# Altium PCB PCB4210B_A00.PcbDoc (part 2 of 2)
Units mm, origin at the board's own origin, x right, y up, seen from the top; angles counter-clockwise.
Board outline 92 x 45 mm, 4 copper layers (Top Layer, Signal Layer 2, Signal Layer 3, Bottom Layer), stack 1.6 mm thick; 99 components, 93 nets, 352 pads, 891 vias.
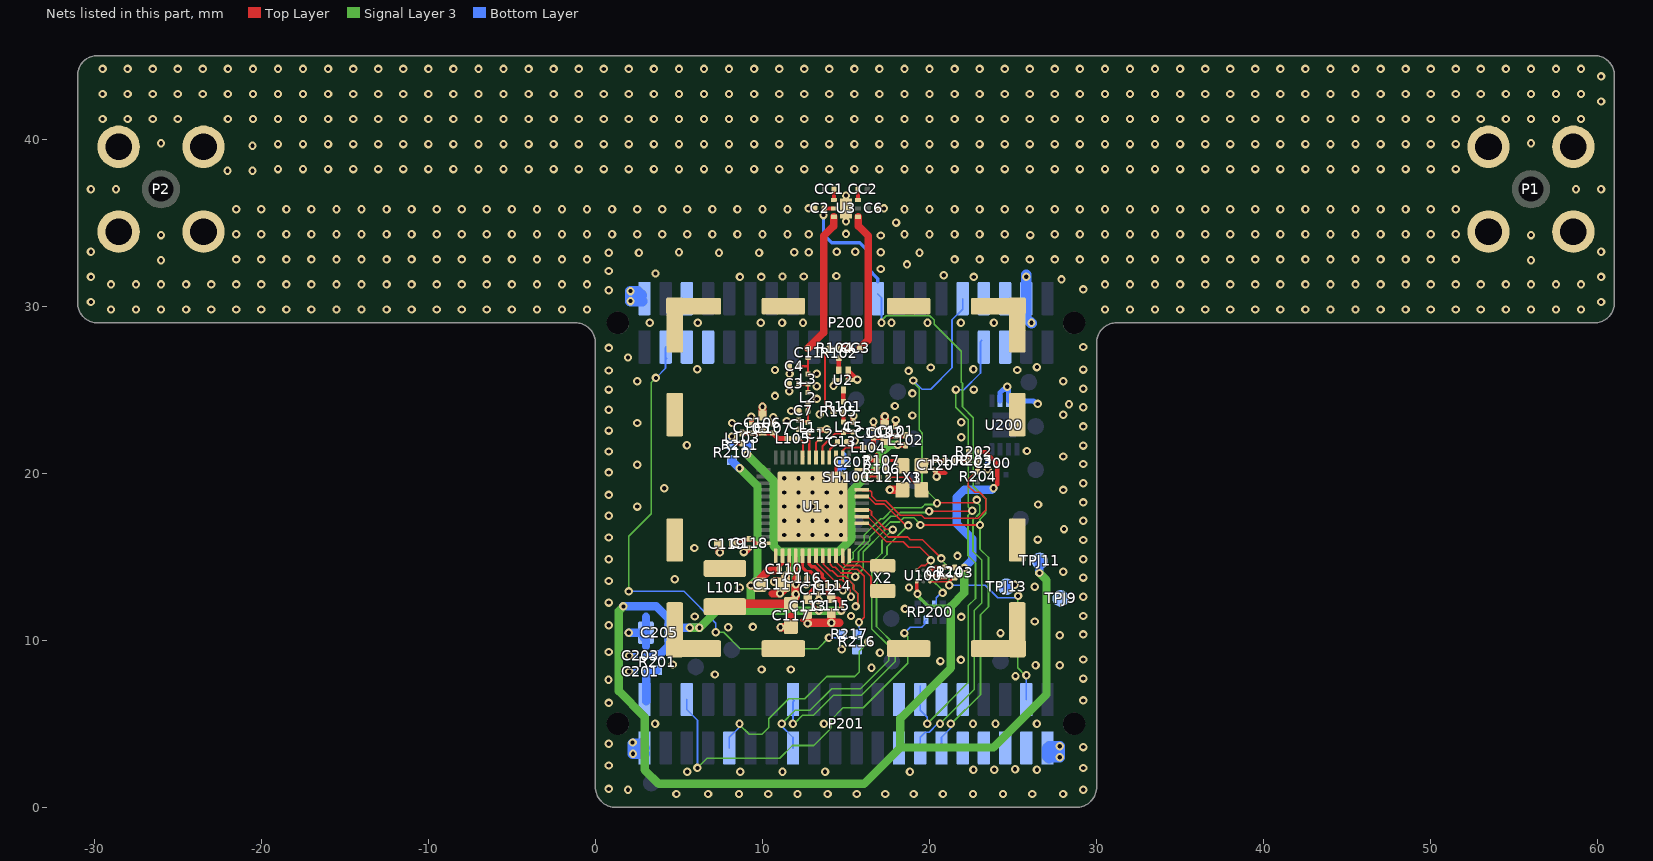
[diagram p4: the nets of this part, all layers, seen from the top]

## Via types
v1: diameter 0.5, hole 0.25, Top Layer to Bottom Layer, tented both sides, 814 vias
v2: diameter 0.508, hole 0.25, Top Layer to Bottom Layer, tented both sides, 77 vias

## Nets (pads, with @x,y where several pads share a name; then routed paths per layer and width w, separated by ;. In a path a pad name is that pad's centre, name@x,y a point inside that pad or via, vN(x,y) a via of type N, cw(c..) or ccw(c..) an arc to the next point about the centre after c; other vN are vias at no path point) (continued)
EFR32_PC3: RP200.3 U1.4 U100.E1 | length 9.4
  Top Layer w0.1: U1.4@15.935,17 16.25,17 16.3,16.95 16.375,16.95 17.425,15.9 18.425,15.9 18.75,15.575 19.425,15.575 20.076,14.924 v2(20.076,14.776) ; U100.E1@19.225,14.2 19.5,14.475 19.75,14.475 v2@20.037,14.762
  Signal Layer 3 w0.1: v2(20.076,14.776) 20.076,13.689 20.784,12.981 v2(20.784,12.828)
  Bottom Layer w0.1: RP200.3@20.3,12.125 20.4,12.225 20.4,12.55 20.731,12.881 v2(20.784,12.828)
EFR32_PC4: P201.38 R103.1 U1.5 U100.A3 | length 21
  Top Layer w0.1: U1.5@15.935,17.4 15.985,17.35 16.35,17.35 17.525,16.175 18.7,16.175 18.85,16.025 19.575,16.025 20.663,14.937 20.627,14.901 v2(20.701,14.901) ; U100.A3@20.025,13.5 20.025,13.495 21.16,13.495 21.415,13.75 R103.1@21.5,13.75 ; v2@21.195,13.47 R103.1@21.45,13.725
  Signal Layer 3 w0.1: v2(20.701,14.901) v2@20.596,14.901 ; v2(21.176,13.296) 21.176,14.32 v2@20.625,14.871 ; v2(25.3,12.65) 25.275,12.625 25.275,8.35 25.75,7.875 25.775,7.9 v2(25.8,7.9) ; v2@20.596,14.901 v2@20.625,14.871 ; v2@20.596,14.901 20.524,14.901 20.494,14.871 v2@20.625,14.871
  Bottom Layer w0.1: v2(21.176,13.296) 23.329,13.296 24.075,12.55 25.2,12.55 v2(25.3,12.65) ; P201.38@25.795,6.45 25.795,7.895 v2(25.8,7.9)
EFR32_PC5: P201.15 U1.6 | length 20.9
  Top Layer w0.1: U1.6@15.935,17.8 16.425,17.8 16.522,17.703 16.522,17.501 17.373,16.65 17.775,16.65 v2(17.8,16.625)
  Signal Layer 3 w0.1: v2(11.15,5) 11.95,5.8 12.85,5.8 14.15,7.1 15.866,7.1 17.55,8.784 17.55,9.675 16.55,10.675 16.55,14.622 17.15,15.222 17.15,15.975 v2(17.8,16.625)
  Bottom Layer w0.1: v2(11.15,5) 11.15,4.85 11.825,4.175 P201.15@11.825,3.55
EFR32_PC7: P201.16 U1.8 | length 22.2
  Top Layer w0.1: U1.8@15.935,18.6 16.3,18.6 16.745,18.155 17.293,18.155 18.573,16.875 v2(18.725,16.875)
  Signal Layer 3 w0.1: v2(11.825,5) 11.9,5 12.4,5.5 13.05,5.5 14.25,6.7 15.925,6.7 17.95,8.725 17.95,9.7 16.825,10.825 16.825,14.5 17.454,15.129 17.454,15.604 v2(18.725,16.875) ; v2@11.9,4.904 v2@11.948,4.952
  Bottom Layer w0.1: v2(11.825,5) 11.825,6.299 11.9,6.375 P201.16@11.825,6.45
EFR32_PC8: R203.2 R204.2 U1.9 | length 12.2
  Top Layer w0.1: U1.9@15.935,19 15.985,18.95 16.45,18.95 16.55,18.85 16.55,18.633 16.828,18.355 17.376,18.355 18.255,17.476 19.524,17.476 19.7,17.3 22.9,17.3 23.375,17.775 23.375,18.475 23,18.85 22.7,18.85 22.325,19.225 22.325,19.625 R204.2@22.75,20.05
  Top Layer w0.2: R204.2@22.9,20.115 R203.2@22.9,20.75
EFR32_PD0: U1.48 X2.1 | length 2
  Top Layer w0.1: U1.48@15.2,14.725 15.225,14.7 17.075,14.7 X2.1@17.15,14.775
EFR32_PD1: U1.47 X2.2 | length 3.7
  Top Layer w0.1: U1.47@14.8,15.065 14.85,15.015 14.85,14.575 14.95,14.475 15.825,14.475 16.5,13.8 16.5,13.275 X2.2@17.15,13.275
EFR32_PD2: R216.1 R217.1 U1.46 | length 6.1
  Top Layer w0.1: U1.46@14.4,15.065 14.4,14.708 14.858,14.25 15.675,14.25 16.1,13.825 16.1,11.375 v1@15.8,11.075
  Signal Layer 3 w0.1: v1@15.775,11.1 v1@15.8,11.075
  Bottom Layer w0.1: R216.1@15.7,10.325 15.775,10.4 v1(15.775,11.075)
EFR32_PD3: C2.2 P200.24 P201.29 U1.45 U3.2 | length 53.2
  Top Layer w0.1: U1.45@14,15.065 14.05,15.015 14.05,14.55 14.225,14.375 14.35,14.375 14.7,14.025 15.35,14.025 15.55,13.825 v1(15.55,13.8) ; v1(19.45,16.9) 19.45,17.002 19.501,16.951 19.526,16.926 19.576,16.976 19.627,16.925 19.652,16.9 v1(23.025,16.9)
  Top Layer w0.25: C2.2@13.7,35.85 U3.2@14.25,35.85
  Signal Layer 3 w0.1: v1(15.55,13.8) 16.025,14.275 16.025,15.292 17.3,16.567 17.3,16.725 17.65,17.075 18.2,17.075 18.45,17.325 19.075,17.325 19.45,16.95 v1(19.45,16.9) ; v1(17.125,29) 16.975,29 17.4,29.425 20.017,29.425 20.276,29.166 20.276,28.924 21.9,27.3 21.9,25.442 21.975,25.367 21.975,23.975 22.625,23.325 22.625,19.225 23.375,18.475 23.375,17.6 23.025,17.25 v1(23.025,16.9) 23.025,15.45 23.525,14.95 23.525,12 23.05,11.525 23.05,6.742 21.308,5 v1(21.275,5)
  Bottom Layer w0.1: P200.24@16.9,30.725 17.125,30.5 v1(17.125,29) ; P201.29@20.715,3.55 20.715,4.19 21.275,4.75 v1(21.275,5)
  Bottom Layer w0.2: v1(13.65,35.45) 13.65,34.296 14.146,33.8 15.825,33.8 16.325,33.3 16.325,32.225 16.9,31.65 P200.24@16.9,31.45
EFR32_PD4: P200.33 P201.28 U1.44 | length 44.3
  Top Layer w0.1: U1.44@13.6,15.065 13.65,15.015 13.65,14.55 14.05,14.15 14.175,14.15 14.5,13.825 14.953,13.825 15.45,13.328 15.45,13.05 15.701,12.799 15.701,12.151 v1(15.575,12.025) ; v1(19.977,17.725) 22.534,17.725 v1(22.555,17.746)
  Signal Layer 3 w0.1: v1(15.575,12.025) 15.7,12.15 15.7,12.8 15.45,13.05 15.45,13.328 15.1,13.678 15.1,14.05 15.75,14.7 15.75,15.3 16.425,15.975 16.425,16.175 17.675,17.425 18.025,17.425 18.25,17.65 19.902,17.65 v1(19.977,17.725) ; v1(19.859,5) 22.325,7.466 22.325,12.075 22.75,12.5 22.75,14.625 22.3,15.075 22.3,17.491 v1(22.555,17.746) 22.325,17.976 22.325,23.2 21.575,23.95 v1(21.575,25)
  Bottom Layer w0.1: P201.28@19.445,7.263 P201.28@19.445,6.45 19.445,5.805 19.859,5.391 v1(19.859,5) ; v1(21.575,25) 22.05,25 23.05,26 23.05,27.875 P200.33@23.125,27.95
EFR32_PD5: P200.32 P201.27 U1.43 | length 47.9
  Top Layer w0.1: U1.43@13.2,15.065 13.2,14.675 14.25,13.625 14.77,13.625 15.25,13.145 v1@15.25,12.601 ; v1@20.326,18.226 22.651,18.226 v1(22.825,18.4)
  Signal Layer 3 w0.1: v1(15.3,12.601) 15.25,12.651 15.25,13.145 14.825,13.57 14.825,14.3 15.425,14.9 15.425,15.25 ; 15.421,15.254 16.1,15.933 16.1,16.3 17.075,17.275 17.221,17.275 17.871,17.925 19.525,17.925 19.725,18.125 v1@20.375,18.125 ; v1@19.05,25.4 19.375,25.075 19.375,22.6 19.55,22.425 19.55,19.225 v1@20.475,18.3 ; v1(20.625,5) 22.675,7.05 22.675,11.775 23.125,12.225 23.125,14.8 22.6,15.325 22.6,17.2 23,17.6 23,18.075 22.825,18.25 v1(22.825,18.4)
  Bottom Layer w0.1: v1(19.024,25.55) 19.549,25.025 20.072,25.025 21.35,26.303 21.35,29.18 21.985,29.815 P200.32@21.985,30.45 ; P201.27@19.445,3.55 19.445,4.195 19.75,4.5 19.975,4.5 20.475,5 v1(20.625,5)
  other v1: 20.451,18.201
EXP_HEADER6: P201.6 RP200.7 | length 23.7
  Signal Layer 3 w0.1: v2@6.11,2.56 v2(6.11,2.358) 6.682,2.93 11.03,2.93 11.8,3.7 13.063,3.7 14.1,4.737 14.1,5.225 14.825,5.95 16.025,5.95 18.7,8.625 18.7,10.225 v2(18.5,10.425)
  Bottom Layer w0.1: P201.6@5.475,6.45 5.475,5.85 6.11,5.215 v2(6.11,2.358) ; v2(18.5,10.425) 18.85,10.775 19.534,10.775 19.7,10.941 19.7,11.125 RP200.7@19.8,11.225
EXP_HEADER9: P201.9 R216.2 | length 13.9
  Signal Layer 3 w0.1: v2@8.6,5.15 8.6,4.975 9.2,4.375 9.975,4.375 10.375,4.775 10.375,5.3 11.575,6.5 12.525,6.5 13.85,7.825 15.525,7.825 15.8,8.1 15.8,9.325 v1@16.4,9.925 ; v1@16.4,9.85 v1@16.475,9.85
  Bottom Layer w0.1: P201.9@8.015,3.55 8.015,4.19 8.625,4.8 v2(8.625,5) ; R216.2@15.9,9.7 16.2,9.7 16.326,9.826 v1(16.326,9.9)
GND: C2.1 C3.2 C4.2 C5.2 C6.1 C7.2 C12.2 C13.2 C101.2 C102.2 C103.2 C105.2 C106.2 C107.2 C110.2 C111.2 C112.2 C113.2 C114.2 C115.2 C116.2 C117.2 C118.2 C119.2 C120.2 C124.2 C200.2 C201.2 C203.2 C205.2 C207.2 P1.2 P1.3 P1.4 P1.5 P2.2 P2.3 P2.4 P2.5 P200.2 P200.38 P201.1 P201.39 R107.2 SH100.1 TPJ13.1 U1.0 U1.15 U1.39 U2.2 U2.3 U2.5 U3.7 U100.B2 U200.2 U200.3 U200.4 X1.2 X3.2 | length 44
  Top Layer w0.125: v1@12.425,28.989 v1(12.425,29)
  Top Layer w0.2: v1@2.2,3.8 v1@2.225,3.825 ; U1.0@11.35,16.4 U1.0@11.5,16.25 ; C110.2@11.6,14.3 U1.39@11.6,15.065 ; 12.35,11.199 12.501,11.199 v1(12.7,11) ; U1.15@14.4,20.935 14.4,19.825 U1.0@14.5,19.725 ; U100.B2@19.825,13.85 20.425,13.85 v1@20.45,13.825
  Top Layer w0.25: U2.3@15.112,26.163 v1(15.675,25.6) ; U2.2@15.138,25.675 U2.3@15.138,26.163 ; v1@16.51,20.75 R107.2@16.835,20.75 ; R107.2@16.825,20.75 16.825,21.075 ; v2@20.35,19.945 20.35,20.175 20.758,20.175 ; v2@20.538,20.013 20.945,20.013
  Top Layer w0.3: v1@8.975,15.225 C118.2@9.2,15.45 ; C105.2@9.35,22.95 9.35,23.3 v1@9.375,23.325 ; C107.2@10.6,22.95 10.625,22.975 v1@10.625,23.375 ; v1(11.401,13.851) 11.416,13.851 11.4,13.867 11.55,14.017 C110.2@11.55,14.275 ; v1@11.575,24.925 11.6,24.95 C3.2@11.6,25.35 ; v1@11.625,25.925 C4.2@11.625,26.4 ; v1@11.775,23.725 C7.2@12.175,23.725 ; v1@12.625,13.4 12.675,13.45 C116.2@12.675,13.725 ; v1@12.725,35.85 C2.1@13.125,35.85 ; C112.2@13.35,12.75 13.35,12.425 v1(13.375,12.4) ; C12.2@13.4,22.6 v1@13.85,22.6 ; C114.2@14.475,13.275 14.495,13.295 14.505,13.295 v1(14.824,12.976) ; C13.2@15.05,21.875 15.45,21.875 v1@15.5,21.925 ; C5.2@15.425,23.025 v1@15.425,23.375 ; v1(15.526,21.94) v1@15.571,21.94 ; C103.2@16.65,22.675 v1(16.65,23.075) v1@16.65,23.125 ; C6.1@16.925,35.85 v1@17.325,35.85 ; C101.2@17.975,22.775 v1@17.975,23.125 ; v1@20.525,13.825 20.55,13.8 C124.2@20.975,13.8
  Top Layer w0.5: C119.2@7.4,15.75 7.45,15.7 v1(7.45,15.25) ; C106.2@10,23.5 10,23.85 v1(10,23.975) ; 10.6,12.8 v1(11.05,12.8) 11.35,13.1 C111.2@11.35,13.2 ; v1(10.7,13.5) 10.95,13.5 11.075,13.375 C111.2@11.05,13.35 ; v1(11.075,10.775) C117.2@11.525,10.775 ; C111.2@11.401,13.176 v1(11.401,13.851) ; C117.2@11.7,10.9 11.7,11.4 ; v1(12.7,11) 12.75,11.05 14.6,11.05 ; v1@12.7,11.05 C113.2@12.7,11.575 ; v1(14.125,11.05) C115.2@14.125,11.6 ; C102.2@17.325,22.85 v1(17.325,23.4) ; v1(17.625,19) X1.2@18.075,19
  Bottom Layer w0.254: v1(0.8,9.3) v1@0.875,9.3 ; v1@1.95,8.125 v1(2.025,8.125) ; v1@1.975,9.075 v1(2.025,9.075) C203.2@2.4,9.075 ; v1@2,8.125 C201.2@2.4,8.125
  Bottom Layer w0.3: v1(2.025,8.125) 2,8.125 C201.2@2.4,8.125 ; v1(2.025,9.075) C203.2@2.4,9.075 ; v1@14.6,19.6 14.6,20.625 14.625,20.65 14.875,20.65 ; 14.875,20.3 14.875,20.65 ; 14.875,21.125 14.875,20.65 ; C207.2@15.1,20.65 14.875,20.65 ; v1@23.4,20.15 v1(23.475,20.225) v1@23.475,20.35 ; v1@23.475,20.4 C200.2@23.475,20.6 ; U200.2@24.225,24.325 24.225,24.825 24.413,25.013 24.688,25.013 24.725,24.975 U200.3@24.725,24.325 ; U200.4@25.225,24.325 26.225,24.325 v1@26.425,24.125
  Bottom Layer w0.5: v1(2,10.45) 2.9,10.45 3,10.35 2.85,10.2 C205.2@2.975,10.075 ; 3.025,9.65 C205.2@3.025,10.45 3.025,11.4 ; P200.38@25.795,30.45 P200.38@25.8,30.455
  Bottom Layer w0.508: TPJ13.1@24.6,13.2 24.725,13.325 v1(25.1,13.325)
  Bottom Layer w0.635: P200.2@2.785,30.65 2.535,30.9 v1(2.1,30.9) v1(2.1,30.3) P200.2@2.8,30.3 ; P201.1@2.9,3.25 2.95,3.2 v1(2.25,3.2) 2.25,3.8 2.685,3.8 P201.1@2.935,3.55 ; v1@25.795,31.868 v1(25.795,31.755) P200.38@25.795,30.45 25.795,29.274 v1@26.101,28.968 ; P201.39@27.065,3.55 27.7,3.55 v1(27.8,3.65) ; P201.39@27.065,3.55 27.065,3.035 27.15,2.95 27.2,3 v1(27.8,3) v1(27.8,3.65) ; P201.39@27.065,3.55 27.165,3.65 v1(27.8,3.65)
  other v1: 4.848,0.8 6.748,0.8 8.598,0.8 10.348,0.8 12.098,0.8 13.898,0.8 15.648,0.8 17.348,0.8 19.048,0.8 20.798,0.8 22.598,0.8 24.398,0.8 26.148,0.8 27.998,0.8 1.948,1.05 29.2,1.05 0.8,1.1 5.5,2.125 8.675,2.125 11.2,2.125 13.75,2.125 18.825,2.125 22.625,2.25 23.875,2.25 26.425,2.25 25.125,2.275 29.2,2.35 0.8,2.5 29.2,3.6 0.8,3.8 2.225,3.875 3.575,5 13.675,5 22.6,5 23.95,5 26.425,5 0.8,6.25 29.2,6.4 0.786,7.638 29.2,7.7 25.15,7.85 7.15,7.95 9.95,8.25 11.7,8.25 16.525,8.35 26.35,8.5 27.8,8.5 4.625,8.55 20.65,8.75 21.875,8.825 29.2,8.85 17.026,9.25 14.75,9.45 27.8,10.3 29.2,10.35 24.25,10.425 7.95,10.775 9.425,10.8 0.8,10.9 26.3,11.125 21.9,11.4 5.95,11.425 15.3,11.45 29.2,11.45 18.525,11.875 0.8,12.25 29.2,12.6 8.65,13.15 18.775,13.159 26.3,13.2 12.625,13.35 0.8,13.55 4.75,13.65 29.2,13.75 20.6,13.9 28,14.1 0.8,14.85 29.2,14.85 21.675,15.05 8.875,15.276 5.925,15.525 29.2,16 26.475,16.025 0.8,16.15 11.3,16.3 12.15,16.3 13,16.3 13.85,16.298 14.7,16.3 28.05,16.65 11.3,17.15 12.15,17.15 13,17.15 13.85,17.148 14.7,17.15 29.2,17.15 0.8,17.45 2.5,18 11.3,18 12.15,18 13,18 13.85,17.998 14.7,18 26.5,18.125 29.2,18.25 0.8,18.7 11.3,18.85 12.15,18.85 13,18.85 13.85,18.848 14.7,18.85 28,19 4.125,19.1 29.2,19.4 11.3,19.7 12.15,19.7 13,19.7 13.85,19.698 14.7,19.7 0.8,20.05 2.5,20.5 29.2,20.55 16.35,20.9 28,21 0.8,21.3 25.825,21.325 29.2,21.65 5.475,21.675 21.9,22.15 0.8,22.55 13.85,22.625 29.2,22.8 2.5,23 8.175,23 21.9,23.05 11.45,23.125 17.975,23.175 10.65,23.35 9.325,23.375 15.45,23.425 18.975,23.45 28,23.5 13.425,23.525 11.725,23.725 0.8,23.8 29.2,23.95 17.925,24.025 28.35,24.125 26.475,24.15 13.25,24.45 10.75,24.625 18.975,24.775 11.6,24.9 0.8,25 22.65,25 29.2,25.05 24.65,25.175 13.25,25.2 14.25,25.225 2.5,25.5 28,25.5 11.625,25.95 13.25,25.95 18.75,26.125 0.8,26.15 10.75,26.175 25.25,26.175 29.2,26.2 6.1,26.225 22.625,26.225 20.075,26.325 26.425,26.35 1.95,26.925 0.8,27.5 29.2,27.55 3.25,29 6.125,29 9.9,29 11.175,29 17.725,29 19.876,29 21.876,29 23.85,29 26.101,29 -29,29.8 -27.5,29.8 -26,29.8 -24.5,29.8 -23,29.8 -21.5,29.8 -20,29.8 -18.5,29.8 -17,29.8 -15.5,29.8 -14,29.8 -12.5,29.8 -11,29.8 -9.5,29.8 -8,29.8 -6.5,29.8 -5,29.8 -3.5,29.8 -2,29.8 -0.5,29.8 30.5,29.8 32,29.8 33.5,29.8 35,29.8 36.5,29.8 38,29.8 39.5,29.8 41,29.8 42.5,29.8 44,29.8 45.5,29.8 47,29.8 48.5,29.8 50,29.8 51.5,29.8 53,29.8 54.5,29.8 56,29.8 57.5,29.8 59,29.8 -30.2,30.25 60.2,30.25 0.8,30.95 29.2,31 -29,31.3 -27.5,31.3 -26,31.3 -24.5,31.3 -23,31.3 -21.5,31.3 -20,31.3 -18.5,31.3 -17,31.3 -15.5,31.3 -14,31.3 -12.5,31.3 -11,31.3 -9.5,31.3 -8,31.3 -6.5,31.3 -5,31.3 -3.5,31.3 -2,31.3 -0.5,31.3 30.5,31.3 32,31.3 33.5,31.3 35,31.3 36.5,31.3 38,31.3 39.5,31.3 41,31.3 42.5,31.3 44,31.3 45.5,31.3 47,31.3 48.5,31.3 50,31.3 51.5,31.3 53,31.3 54.5,31.3 56,31.3 57.5,31.3 59,31.3 27.9,31.6 -30.2,31.75 8.65,31.75 9.925,31.75 22.65,31.75 60.2,31.75 11.2,31.775 12.475,31.775 14.425,31.8 20.85,31.85 3.6,31.95 0.8,32.1 17.075,32.225 18.65,32.5 -26,32.75 56,32.75 -21.5,32.8 -20,32.8 -18.5,32.8 -17,32.8 -15.5,32.8 -14,32.8 -12.5,32.8 -11,32.8 -9.5,32.8 -8,32.8 -6.5,32.8 -5,32.8 -3.5,32.8 -2,32.8 -0.5,32.8 21.5,32.8 23,32.8 24.5,32.8 26,32.8 27.5,32.8 29,32.8 30.5,32.8 32,32.8 33.5,32.8 35,32.8 36.5,32.8 38,32.8 39.5,32.8 41,32.8 42.5,32.8 44,32.8 45.5,32.8 47,32.8 48.5,32.8 50,32.8 51.5,32.8 0.8,33.2 2.6,33.2 7.4,33.2 9.8,33.2 19.4,33.2 5,33.227 11.9,33.225 12.775,33.225 17.075,33.225 -30.2,33.25 14.45,33.25 15.55,33.25 60.2,33.25 17.075,34.225 -26,34.25 26.025,34.25 56,34.25 -21.5,34.3 -20,34.3 -18.5,34.3 -17,34.3 -15.5,34.3 -14,34.3 -12.5,34.3 -11,34.3 -9.5,34.3 -8,34.3 -6.5,34.3 -5,34.3 -3.5,34.3 -2,34.3 -0.5,34.3 1,34.3 2.5,34.3 4,34.3 5.5,34.3 7,34.3 8.5,34.3 10,34.3 11.5,34.3 12.775,34.3 18.5,34.3 20,34.3 21.5,34.3 23,34.3 24.5,34.3 27.5,34.3 29,34.3 30.5,34.3 32,34.3 33.5,34.3 35,34.3 36.5,34.3 38,34.3 39.5,34.3 41,34.3 42.5,34.3 44,34.3 45.5,34.3 47,34.3 48.5,34.3 50,34.3 51.5,34.3 15,34.325 18,35 15,35.075 -21.5,35.8 -20,35.8 -18.5,35.8 -17,35.8 -15.5,35.8 -14,35.8 -12.5,35.8 -11,35.8 -9.5,35.8 -8,35.8 -6.5,35.8 -5,35.8 -3.5,35.8 -2,35.8 -0.5,35.8 1,35.8 2.5,35.8 4,35.8 5.5,35.8 7,35.8 8.5,35.8 10,35.8 11.5,35.8 18.5,35.8 20,35.8 21.5,35.8 23,35.8 24.5,35.8 26,35.8 27.5,35.8 29,35.8 30.5,35.8 32,35.8 33.5,35.8 35,35.8 36.5,35.8 38,35.8 39.5,35.8 41,35.8 42.5,35.8 44,35.8 45.5,35.8 47,35.8 48.5,35.8 50,35.8 51.5,35.8 12.775,35.85 17.275,35.85 15,36.625 -30.2,37 -28.7,37 58.7,37 60.2,37 -22.025,38.1 -20.525,38.1 -19,38.2 -17.5,38.2 -16,38.2 -14.5,38.2 -13,38.2 -11.5,38.2 -10,38.2 -8.5,38.2 -7,38.2 -5.5,38.2 -4,38.2 -2.5,38.2 -1,38.2 0.5,38.2 2,38.2 3.5,38.2 5,38.2 6.5,38.2 8,38.2 9.5,38.2 11,38.2 12.5,38.2 14,38.2 15.5,38.2 17,38.2 18.5,38.2 20,38.2 21.5,38.2 23,38.2 24.5,38.2 26,38.2 27.5,38.2 29,38.2 30.5,38.2 32,38.2 33.5,38.2 35,38.2 36.5,38.2 38,38.2 39.5,38.2 41,38.2 42.5,38.2 44,38.2 45.5,38.2 47,38.2 48.5,38.2 50,38.2 51.5,38.2 -20.525,39.6 -19,39.7 -17.5,39.7 -16,39.7 -14.5,39.7 -13,39.7 -11.5,39.7 -10,39.7 -8.5,39.7 -7,39.7 -5.5,39.7 -4,39.7 -2.5,39.7 -1,39.7 0.5,39.7 2,39.7 3.5,39.7 5,39.7 6.5,39.7 8,39.7 9.5,39.7 11,39.7 12.5,39.7 14,39.7 15.5,39.7 17,39.7 18.5,39.7 20,39.7 21.5,39.7 23,39.7 24.5,39.7 26,39.7 27.5,39.7 29,39.7 30.5,39.7 32,39.7 33.5,39.7 35,39.7 36.5,39.7 38,39.7 39.5,39.7 41,39.7 42.5,39.7 44,39.7 45.5,39.7 47,39.7 48.5,39.7 50,39.7 51.5,39.7 -26,39.75 56,39.75 -29.5,41.2 -28,41.2 -26.5,41.2 -25,41.2 -22,41.2 -20.5,41.2 -19,41.2 -17.5,41.2 -16,41.2 -14.5,41.2 -13,41.2 -11.5,41.2 -10,41.2 -8.5,41.2 -7,41.2 -5.5,41.2 -4,41.2 -2.5,41.2 -1,41.2 0.5,41.2 2,41.2 3.5,41.2 5,41.2 6.5,41.2 8,41.2 9.5,41.2 11,41.2 12.5,41.2 14,41.2 15.5,41.2 17,41.2 18.5,41.2 20,41.2 21.5,41.2 23,41.2 24.5,41.2 26,41.2 27.5,41.2 29,41.2 30.5,41.2 32,41.2 33.5,41.2 35,41.2 36.5,41.2 38,41.2 39.5,41.2 41,41.2 42.5,41.2 44,41.2 45.5,41.2 47,41.2 48.5,41.2 50,41.2 51.5,41.2 53,41.2 54.5,41.2 56,41.2 57.5,41.2 59,41.2 60.2,42.25 -29.5,42.7 -28,42.7 -26.5,42.7 -25,42.7 -23.5,42.7 -22,42.7 -20.5,42.7 -19,42.7 -17.5,42.7 -16,42.7 -14.5,42.7 -13,42.7 -11.5,42.7 -10,42.7 -8.5,42.7 -7,42.7 -5.5,42.7 -4,42.7 -2.5,42.7 -1,42.7 0.5,42.7 2,42.7 3.5,42.7 5,42.7 6.5,42.7 8,42.7 9.5,42.7 11,42.7 12.5,42.7 14,42.7 15.5,42.7 17,42.7 18.5,42.7 20,42.7 21.5,42.7 23,42.7 24.5,42.7 26,42.7 27.5,42.7 29,42.7 30.5,42.7 32,42.7 33.5,42.7 35,42.7 36.5,42.7 38,42.7 39.5,42.7 41,42.7 42.5,42.7 44,42.7 45.5,42.7 47,42.7 48.5,42.7 50,42.7 51.5,42.7 53,42.7 54.5,42.7 56,42.7 57.5,42.7 59,42.7 60.2,43.75 -29.5,44.2 -28,44.2 -26.5,44.2 -25,44.2 -23.5,44.2 -22,44.2 -20.5,44.2 -19,44.2 -17.5,44.2 -16,44.2 -14.5,44.2 -13,44.2 -11.5,44.2 -10,44.2 -8.5,44.2 -7,44.2 -5.5,44.2 -4,44.2 -2.5,44.2 -1,44.2 0.5,44.2 2,44.2 3.5,44.2 5,44.2 6.5,44.2 8,44.2 9.5,44.2 11,44.2 12.5,44.2 14,44.2 15.5,44.2 17,44.2 18.5,44.2 20,44.2 21.5,44.2 23,44.2 24.5,44.2 26,44.2 27.5,44.2 29,44.2 30.5,44.2 32,44.2 33.5,44.2 35,44.2 36.5,44.2 38,44.2 39.5,44.2 41,44.2 42.5,44.2 44,44.2 45.5,44.2 47,44.2 48.5,44.2 50,44.2 51.5,44.2 53,44.2 54.5,44.2 56,44.2 57.5,44.2 59,44.2
  other v2: 20.425,19.8
JOYSTICK: P200.3 R217.2 | length 31.3
  Signal Layer 3 w0.1: v1(2,12.925) 2,16.225 3.35,17.575 3.35,25.425 v2(3.625,25.7) v2@3.75,25.575 ; v1(7.2,10.475) 7.675,10.475 8.65,9.5 13.325,9.5 v1(13.975,10.15) v1@14.05,10.225
  Bottom Layer w0.1: v1(2,12.925) 5.3,12.925 7.2,11.025 v1@7.2,10.5 ; v2(3.625,25.7) 4.2,26.275 P200.3@4.2,27.5 ; P200.3@4.205,27.55 4.205,26.92 P200.3@4.263,26.862 ; v1@14,10.125 14.025,10.15 14.55,10.15 R217.2@14.75,10.35
NetC1_1: C1.1 L1.1 U1.19 | length 2.1
  Top Layer w0.1: C1.1@12.25,22.625 12.25,22.55 12.225,22.525 12.6,22.525 L1.1@12.675,22.45
  Top Layer w0.125: U1.19@12.8,20.95 L1.1@12.8,22.425
NetC1_2: C1.2 C7.1 L1.2 L2.1 | length 1.8
  Top Layer w0.125: C1.2@12.225,23.1 12.65,23.1 L1.2@12.725,23.025 ; L1.2@12.73,22.987 12.73,23.725 L2.1@12.73,24.225
NetC3_1: C3.1 L2.2 L3.1 | length 1.2
  Top Layer w0.125: C3.1@12.125,25.325 L3.1@12.725,25.325 ; L2.2@12.725,24.75 L3.1@12.725,25.325 ; L3.1@12.725,25.275 L3.1@12.725,25.325
NetC4_1: C4.1 C11.1 L3.2 | length 2.2
  Top Layer w0.125: C4.1@12.179,26.354 12.225,26.4 12.725,26.4 12.725,26.933 C11.1@12.73,26.938 ; L3.2@12.73,25.845 C11.1@12.73,26.925
NetC5_1: C5.1 L4.1 U1.17 | length 2.8
  Top Layer w0.125: U1.17@13.6,20.95 13.6,21.625 14.35,22.375 14.875,22.375 14.875,22.425 15.3,22.425 C5.1@15.35,22.475 ; L4.1@14.847,22.445 L4.1@14.85,22.45 L4.1@14.86,22.463
NetC11_2: C11.2 U3.3 | length 8.5
  Top Layer w0.442: 14.275,34.8 U3.3@14.275,35.35
  Top Layer w0.457: C11.2@12.725,27.475 13.675,28.425 13.675,34.2 14.275,34.8
NetC12_1: C12.1 U1.18 | length 1.1
  Top Layer w0.125: U1.18@13.2,20.95 13.2,21.825 C12.1@13.35,21.975
NetC13_1: C13.1 U1.16 | length 1.1
  Top Layer w0.125: U1.16@14,20.95 14.05,21 14.05,21.45 14.4,21.8 C13.1@14.5,21.8
NetC101_1: C101.1 C102.1 C103.1 L102.2 L104.1 | length 2.5
  Top Layer w0.3: L104.1@16.65,21.6 C103.1@16.65,22.125 17.55,22.125 17.65,22.225 C101.1@17.975,22.225 L102.2@18.55,22.225
NetC105_1: C105.1 C106.1 C107.1 L103.2 L105.1 | length 3
  Top Layer w0.3: L103.2@8.775,22.4 C105.1@9.35,22.4 9.85,22.4 C106.1@10,22.55 10.15,22.4 C107.1@10.625,22.4 10.95,22.075 L105.1@11.5,22.075
NetC118_1: C118.1 C119.1 U1.36 | length 1.7
  Top Layer w0.2: C119.1@8.475,15.9 8.775,15.9 8.9,16.025 9.375,16.025 9.6,15.8 U1.36@10.065,15.8 U1.36@10.075,15.8
NetC120_1: C120.1 R108.2 X1.4 X3.4 | length 1.1
  Top Layer w0.2: X1.4@19.7,20.75 C120.1@20.25,20.75 ; C120.1@20.325,20.75 R108.2@20.875,20.75
NetC121_1: C121.1 X1.3 X3.3 | length 1.8
  Top Layer w0.1: C121.1@17.525,19.75 18.75,19.75 X1.3@19.125,19.375
NetC121_2: C121.2 U1.11 | length 1
  Top Layer w0.1: U1.11@15.935,19.8 16.875,19.8 C121.2@16.95,19.875
NetCC1_1: CC1.1 U3.1 | length 0.5
  Top Layer w0.25: U3.1@14.275,36.35 CC1.1@14.275,36.85
NetCC2_1: CC2.1 U3.6 | length 0.5
  Top Layer w0.25: U3.6@15.725,36.35 CC2.1@15.725,36.85
NetCC3_1: CC3.1 R102.2 R104.1 | length 0.6
  Top Layer w0.457: R104.1@14.66,27.485 CC3.1@15.24,27.485
NetCC3_2: CC3.2 U3.4 | length 8.2
  Top Layer w0.442: 15.725,34.8 U3.4@15.725,35.35
  Top Layer w0.457: 15.725,34.8 16.325,34.2 16.325,27.975 ; CC3.2@15.85,27.5 16.275,27.925
NetL4_2: L4.2 R101.1 R105.1 | length 0.6
  Top Layer w0.25: L4.2@14.85,23.05 R105.1@14.85,23.63
NetL101_1: L101.1 U1.37
NetL104_2: L104.2 U1.14 | length 1.7
  Top Layer w0.125: U1.14@14.8,20.935 14.8,21.35 14.977,21.527 15.973,21.527 15.975,21.525 L104.2@16.025,21.525 L104.2@16.05,21.525
NetL105_2: L105.2 U1.20 | length 1.2
  Top Layer w0.125: L105.2@12.261,22.014 12.438,21.837 U1.20@12.438,20.988 ; U1.20@12.4,20.95 U1.20@12.45,21
NetR101_2: R101.2 U2.1 | length 0.6
  Top Layer w0.25: R101.2@14.84,24.265 U2.1@14.84,24.845
NetR102_1: R102.1 U2.4 | length 0.6
  Top Layer w0.25: U2.4@14.565,26.23 R102.1@14.565,26.81
NetR104_2: R104.2 R105.2 | length 4.1
  Top Layer w0.125: R104.2@14.025,27.41 13.75,27.135 13.75,24.175 R105.2@14.25,23.675
NetR106_1: R106.1 R107.1 X1.1 X3.1 | length 1
  Top Layer w0.2: R106.1@17.425,20.25 R107.1@17.425,20.75 ; R107.1@17.425,20.76 17.925,20.76
NetR106_2: R106.2 U1.12 | length 0.8
  Top Layer w0.1: U1.12@15.935,20.2 R106.2@16.75,20.2
PAVDD: L103.1 R210.1 R211.2 | length 1.1
  Top Layer w0.3: v1(8.175,22.2) 8.15,22.2 8.125,22.175 8.5,21.8 L103.1@8.775,21.8
  Bottom Layer w0.5: R211.2@8.175,21.925 v1(8.175,22.2)
TCXO_supply: R108.1 R202.1 R203.1 | length 1.3
  Top Layer w0.25: R108.1@21.55,20.75 R203.1@22.325,20.75 ; R203.1@22.35,20.75 R202.1@22.35,21.275
USB_VBUS: P200.35
USB_VREG: P200.36
VDCDC: C116.1 C117.1 L101.2 L102.1 R211.1 U1.40 | length 29.9
  Top Layer w0.2: C116.1@12,13.85 12,14.55 U1.40@12,14.955
  Top Layer w0.3: v1(18.1,21.7) 18.5,21.7 L102.1@18.575,21.625
  Top Layer w0.5: L101.2@8.625,12.175 C117.1@11.55,12.175 ; C117.1@11.575,12.175 12,12.6 v1(12,12.75) ; v1@12.001,12.849 v1(12.001,13.351) 12.025,13.375 C116.1@12.025,13.685
  Signal Layer 3 w0.5: v2(9.075,21.125) 10.675,19.525 10.675,15.65 11.025,15.3 12.001,15.3 ; v1(12,12.75) v1@12,13.301 ; v1(12.001,13.351) 12.001,15.3 ; v1(18.1,21.7) 17.6,21.7 16.975,21.075 16.975,20.575 ; 12.001,15.3 14.549,15.3 15.325,16.076 15.325,18.925 ; 15.325,18.925 16.975,20.575 ; 15.325,18.925 16.975,20.575
  Bottom Layer w0.5: v2(9.075,21.125) 9.075,21.699 R211.1@9.1,21.725
VMCU: C110.1 C111.1 C112.1 C113.1 C114.1 C115.1 C124.1 C203.1 C205.1 R103.2 R201.2 R202.2 R210.2 TPJ11.1 U1.38 U1.41 U1.42 U100.A1 U100.E3 | length 114.1
  Top Layer w0.2: 10.625,14.025 10.775,14.025 C110.1@11,14.25 ; C110.1@10.9,14.25 10.9,14.275 10.9,14.3 11.2,14.6 U1.38@11.2,15.065 ; U1.41@12.4,15.08 U1.41@12.4,15.065 ; C113.1@12.65,12.575 12.85,12.575 12.85,12.9 13.2,13.25 13.2,13.8 12.9,14.1 12.65,14.1 12.4,14.35 12.4,14.575 ; C113.1@12.7,12.475 12.7,12.439 13.289,11.85 v1@13.375,11.85 ; U1.42@12.8,15 12.8,14.55 12.95,14.4 13.121,14.4 13.579,13.942 13.579,13.761 13.939,13.401 C114.1@13.95,13.39 ; v1@19.225,12.924 U100.E3@19.225,13.5 ; U100.A1@20.025,14.225 U100.A1@20.025,14.2 20.167,14.2 20.342,14.375 20.64,14.375 20.761,14.375 20.79,14.346 20.896,14.346 C124.1@20.925,14.375 C124.1@20.95,14.35 ; C124.1@21,14.35 R103.2@21.475,14.35 ; R103.2@21.5,14.35 21.55,14.4 21.625,14.325 v2(22.075,14.325) ; 12.4,14.575 U1.41@12.4,15.065 ; 12.4,14.575 U1.41@12.4,15.065
  Top Layer w0.25: R202.2@22.95,21.275 23.35,21.275 24.05,20.575 24.05,19.325 v1(23.825,19.1) v1@23.775,19.05
  Top Layer w0.3: 10.525,14.175 10.625,14.275 10.9,14.275 C110.1@11,14.275 ; C114.1@13.925,13.225 13.925,12.775 C115.1@14.125,12.575 ; C115.1@14.025,12.65 C115.1@14.05,12.625 ; C115.1@14.25,12.475 14.525,12.475 14.725,12.275 v1(14.725,11.775)
  Top Layer w0.5: v1(9.3,13.275) C111.1@9.825,13.275 ; C111.1@9.85,13.175 C111.1@9.825,13.175 ; 10.65,14.175 10.525,14.175 10.375,14.175 9.825,13.625 C111.1@9.825,13.275 ; C111.1@9.825,13.175 9.925,13.275 C111.1@9.825,13.275 ; C111.1@9.825,13.175 C111.1@9.825,13.275
  Signal Layer 3 w0.2: v1(19.276,12.776) 19.276,12.719 19.25,12.693 19.918,12.025 21.275,12.025
  Signal Layer 3 w0.5: v2(1.675,12.025) 1.4,11.75 1.4,6.95 2.95,5.4 2.95,2.24 3.79,1.4 16.075,1.4 18.25,3.575 ; v1(5.65,10.75) v1(6.225,10.75) 6.25,10.75 7.275,11.775 9.3,11.775 ; v2(8.628,20.297) 9.7,19.225 9.7,13.675 v1(9.3,13.275) 9.3,11.775 ; v1(14.725,11.775) v1(13.375,11.775) 9.3,11.775 ; v2(22.075,14.325) 22.075,12.825 21.275,12.025 21.275,8.35 18.25,5.325 18.25,3.575 ; v1(26.575,14.025) 27,13.6 27,6.75 23.825,3.575 18.25,3.575
  Bottom Layer w0.4: C203.1@3,9.075 R201.2@3.8,9.075
  Bottom Layer w0.5: v2(1.675,12.025) 3.65,12.025 4.4,11.275 C205.1@4.4,10.35 ; R201.2@3.775,9.1 3.8,9.075 4.4,9.675 C205.1@4.4,10.35 ; C205.1@4.55,10.75 v1(5.65,10.75) v1(6.225,10.75) ; C205.1@4.625,10.35 C205.1@4.4,10.35 ; R210.2@8.175,20.725 8.603,20.297 v2(8.628,20.297) ; v2(22.075,14.325) 22.55,14.8 22.55,16.075 21.625,17 21.625,18.55 22.075,19 23.725,19 v1(23.825,19.1)
  Bottom Layer w0.508: v1(26.575,14.025) 26.575,14.575 TPJ11.1@26.5,14.65 ; TPJ11.1@26.6,14.75 TPJ11.1@26.55,14.7 ; TPJ11.1@26.65,14.7 26.6,14.65 TPJ11.1@26.55,14.7 ; TPJ11.1@26.5,14.65 TPJ11.1@26.55,14.7 ; TPJ11.1@26.5,14.65 TPJ11.1@26.55,14.7
  Bottom Layer w0.75: C205.1@4.625,10.35 4.725,10.45 C205.1@4.625,10.45
VMCU_IN: C201.1 P201.2 R201.1 | length 2.3
  Bottom Layer w0.5: P201.2@3.05,6.335 3.05,8 3.225,8.175 R201.1@3.65,8.175
VRF: TPJ9.1
WSTK_F21: P200.34
WSTK_P22: P201.25
WSTK_P23: P201.26
WSTK_P27: P201.30
WSTK_P28: P201.31
WSTK_P29: P201.32
WSTK_P30: P201.33
WSTK_P32: P201.35
WSTK_P34: P201.37
WSTK_P38: P200.5
WSTK_P39: P200.6
WSTK_P40: P200.7
pads on no net: P200.M1 P200.M2 P201.40 P201.M1 P201.M2 RP200.4 RP200.5 TPJ18.1 TPJ19.1 TPJ20.1 U100.C1 U200.9

## Polygon pours and split planes (outlines as drawn)
GND on Signal Layer 3 "Signal Layer 3-GND" (solid, remove dead copper, pour order 3): 0,27.8 ccw(c-1.2,27.8) -1.2,29 -29.8,29 cw(c-29.8,30.2) -31,30.2 -31,43.8 cw(c-29.8,43.8) -29.8,45 59.8,45 cw(c59.8,43.8) 61,43.8 61,30.2 cw(c59.8,30.2) 59.8,29 31.2,29 ccw(c31.2,27.8) 30,27.8 30,1.2 cw(c28.8,1.2) 28.8,0 1.2,0 cw(c1.2,1.2) 0,1.2
GND on Signal Layer 2 "Signal Layer 2-GND" (solid, remove dead copper, pour order 7): 0,27.8 ccw(c-1.2,27.8) -1.2,29 -29.8,29 cw(c-29.8,30.2) -31,30.2 -31,43.8 cw(c-29.8,43.8) -29.8,45 59.8,45 cw(c59.8,43.8) 61,43.8 61,30.2 cw(c59.8,30.2) 59.8,29 31.2,29 ccw(c31.2,27.8) 30,27.8 30,1.2 cw(c28.8,1.2) 28.8,0 1.2,0 cw(c1.2,1.2) 0,1.2
GND on Top Layer "Top Layer-GND" (solid, remove dead copper, pour order 8): 0,27.8 ccw(c-1.2,27.8) -1.2,29 -29.8,29 cw(c-29.8,30.2) -31,30.2 -31,43.8 cw(c-29.8,43.8) -29.8,45 59.8,45 cw(c59.8,43.8) 61,43.8 61,30.2 cw(c59.8,30.2) 59.8,29 31.2,29 ccw(c31.2,27.8) 30,27.8 30,1.2 cw(c28.8,1.2) 28.8,0 1.2,0 cw(c1.2,1.2) 0,1.2
GND on Bottom Layer "Top Layer-GND" (solid, remove dead copper, pour order 9): 0.062,27.8 ccw(c-1.138,27.8) -1.138,29 -29.737,29 cw(c-29.737,30.2) -30.937,30.2 -30.937,43.8 cw(c-29.737,43.8) -29.737,45 59.863,45 cw(c59.862,43.8) 61.063,43.8 61.063,30.2 cw(c59.863,30.2) 59.863,29 31.263,29 ccw(c31.263,27.8) 30.063,27.8 30.063,1.2 cw(c28.863,1.2) 28.863,0 1.263,0 cw(c1.263,1.2) 0.063,1.2

## Other copper
Top Layer:
  pour cut-out: 11.175,24.425 11.175,23.3 12.45,23.3 12.45,24.425
  region net GND: 15.525,25.8 15.725,25.8 15.725,25.925 15.525,25.925
  region net GND: 13,25.925 13,26.375 13.225,26.375 13.225,27.175 13.5,27.175 13.5,26.5 13.5,23.8 13.85,23.45 13.85,23.225 13.025,23.225
  region net GND: 14.2,25.475 14.2,25.225 14.5,25.225 14.5,25.475
  region net EFR32_PB3: 16.5,35.775 16.5,35.55 16.2,35.55 16.2,35.775
  region net EFR32_PD3: 13.55,35.775 13.55,35.55 13.85,35.55 13.85,35.775
  pour cut-out: 19.95,21.025 22.075,21.025 22.075,20.475 19.95,20.475
  pour cut-out: 12.875,22.375 15.425,22.375 15.425,27.875 12.875,27.875
  pour cut-out: 17.223,21.01 18.065,21.01 20.05,21.01 20.05,18.575 19.675,18.575 19.325,18.225 19,18.225 18.625,18.6 16.75,18.6 16.75,20.537
  region net NetL101_1: 7.762,13.8 7.763,14.8 9.05,14.8 9.75,15.5 10.912,15.5 10.912,14.65 9.9,14.65 9.05,13.8
  pour cut-out: 12.6,26.8 12.6,27.35 12.225,27.35 12.225,26.8 11,26.8 11,24.412 12.6,24.413
  pour cut-out: 11.175,22.65 11.175,24.375 9.35,24.375 8.5,23.525 8.5,22.65
  pour cut-out: 18.4,22.075 18.4,23.388 18.012,23.775 16.9,23.775 16.65,23.525 16,23.525 15.475,24.05 15.1,24.05 15.1,22.075
Bottom Layer:
  pour cut-out: 19.375,26.838 18.1,26.838 18.1,26.462 19.375,26.462
  pour cut-out: 23.25,26.838 21.975,26.838 21.975,26.462 23.25,26.462
  pour cut-out: 8.05,31.538 6.775,31.538 6.775,31.163 8.05,31.163
  pour cut-out: 5.65,28.637 4.375,28.637 4.375,28.262 5.65,28.262
  pour cut-out: 9.25,26.838 7.975,26.838 7.975,26.462 9.25,26.462
  pour cut-out: 17.175,31.538 14.425,31.538 14.425,31.163 17.175,31.163
  pour cut-out: 20.55,2.837 14.527,2.837 14.527,2.462 20.55,2.462
  pour cut-out: 13.25,2.837 8.177,2.837 8.177,2.462 13.25,2.462
  pour cut-out: 13.175,7.538 4.475,7.538 4.475,7.163 13.175,7.163
  pour cut-out: 20.6,7.538 17.05,7.538 17.05,7.163 20.6,7.163
  pour cut-out: 23.225,30.75 23.225,28.85 23.6,28.85 23.6,30.75
  pour cut-out: 21.1,11.863 19,11.863 19,11.488 21.1,11.488

## Silkscreen, mask and mechanical layers (free items; w line width, h text height)
Top Overlay:
  text "EFR32xG23/28 Diversity Board with Discrete Match" at -18.95,41.525 h3.2
  text "868-915 MHz" at -19.025,39.6 h1.9
  text "ANT2" at -19.075,33.125 h3.2
  text "ANT1" at 41.8,33.125 h3.2
Bottom Overlay:
  lines w0.15: 1.5,38 1.5,37 2.5,37 ; 1.5,42 1.5,43 2.5,43 ; 19.5,37 20.5,37 20.5,38 ; 19.5,43 20.5,43 20.5,42
  lines w0.152: 7.675,20.525 7.675,20.225 7.975,20.225 ; 7.675,21.475 7.675,21.225 7.775,21.225 ; 7.675,21.925 7.675,22.175 7.775,22.175 ; 8.375,20.225 8.675,20.225 8.675,20.525 ; 8.375,22.175 8.675,22.175 ; 8.675,20.875 8.675,21.175 8.975,21.175 ; 9.325,21.175 9.625,21.175 9.625,21.475 ; 9.325,22.175 9.625,22.175 9.625,21.875 ; 14.2,10.175 14.2,9.875 14.5,9.875 ; 14.2,10.575 14.2,10.875 14.5,10.875 ; 14.85,9.875 15.15,9.875 15.15,9.575 ; 15.15,9.225 15.15,8.925 15.45,8.925 ; 15.2,10.775 15.2,10.875 15.45,10.875 ; 15.85,8.925 16.15,8.925 16.15,9.225 ; 15.9,10.875 16.15,10.875 16.15,10.775 ; 16.15,9.875 16.15,10.175
  text "BOARD INFO" at 20.55,43.35 h1.6
  text "PAVDD / Config." at 12.3,22.45 h1.6
  text "VDCDC" at 13.825,21.25 h1.2
  text "VMCU" at 6.6,19.075 h1.2 r270
  text "PCB4210A Rev. A01" at 28,13.7 h1.52 r270
  text "EFR32_PD02 / Config." at 18.8,11.025 h1.6
  text "JOYSTICK" at 13.9,9.975 h1.2
  text "EXP9" at 16.375,8.5 h1.2 r270
Top Solder:
  the board outline again, w0.8
Bottom Solder:
  the board outline again, w0.8
BOARD OUTLINE 1:
  the board outline again, w0.1
Mechanical 11:
  the board outline again, w0.1
Mechanical 12:
  the board outline again, w0.1
Mechanical 15:
  lines w0.025: 69.971,-48.875 70.179,-48.875 ; 70.075,-48.979 70.075,-48.771
  lines w0.1: -0.5,0 0.5,0 ; 0,-0.5 0,0.5
Mechanical 16:
  lines w0.1: -0.5,0 0.5,0 ; 0,-0.5 0,0.5
Mechanical 26:
  lines w0.2: -122.4,-40.25 -120.775,-40.25 ; -122.4,6.425 -120.775,6.425 ; -122.4,53.1 -120.775,53.1 ; -67.75,-88.5 -67.75,-86.9 ; -67.75,99.8 -67.75,101.4 ; -14.725,-88.5 -14.725,-86.9 ; -14.725,99.8 -14.725,101.4 ; 38.3,-88.5 38.3,-86.9 ; 38.3,99.8 38.3,101.4 ; 91.325,-88.5 91.325,-86.9 ; 91.325,99.8 91.325,101.4 ; 144.35,-40.225 145.975,-40.225 ; 144.35,6.45 145.975,6.45 ; 144.35,53.125 145.975,53.125 ; 145.975,-88.5 -122.4,-88.5 -122.4,101.4 145.975,101.4 145.975,-88.475 ; -120.775,-86.9 -120.775,99.8 144.35,99.8 144.35,-86.9 -120.775,-86.9
  text "5" at -94.425,100.325 h0.5
  text "4" at -41.4,100.3 h0.5
  text "3" at 11.625,100.3 h0.5
  text "2" at 64.65,100.3 h0.5
  text "1" at 117.775,100.3 h0.5
  text "D" at 145.025,76.2 h0.5
  text "D" at -121.725,76.175 h0.5
  text "C" at 145.025,29.5 h0.5
  text "C" at -121.725,29.475 h0.5
  text "B" at 145.025,-17.175 h0.5
  text "B" at -121.725,-17.2 h0.5
  text "A" at 145.025,-63.825 h0.5
  text "A" at -121.725,-63.85 h0.5
  text "5" at -94.425,-87.975 h0.5
  text "4" at -41.4,-88 h0.5
  text "3" at 11.625,-88 h0.5
  text "2" at 64.65,-88 h0.5
  text "1" at 117.775,-88 h0.5
Mechanical 27:
  drawing of 28 lines, arcs and shapes, not listed
  text "Board Title" at 74.75,-61.95 h2.5
  text ".BoardTitle" at 76.15,-67.5 h3.5
  text "Page Title" at 74.75,-71.675 h2.5
  text "Designed:" at 42.5,-75.425 h1.7
  text "Approved:" at 58.7,-75.425 h1.7
  text "Top Assembly" at 76.15,-75.575 h3.2
  text "TAB" at 44.025,-77.925 h2.2
  text "RGU" at 60.075,-77.925 h2.2
  text "Revision" at 132.65,-78.7 h1.7
  text "Document number" at 74.75,-78.975 h2.35
  text "Size" at 42.5,-80.175 h1.7
  text "BOM Doc. No:" at 47.425,-80.175 h1.7
  text ".BoardRevision" at 132.925,-81.75 h2.7
  text ".BoardName" at 76.15,-81.85 h3.2
  text "A4" at 43.075,-82.025 h2
  text "<>" at 48,-82.025 h2
  text "Design Created Date:" at 42.5,-84.375 h1.7
  text "Sheet Created Date:" at 74.175,-84.375 h1.7
  text "Sheet Modified Date:" at 102.6,-84.375 h1.7
  text "Sheet" at 132.65,-84.375 h1.7
  text "Monday, July 13, 2020" at 43.575,-86.325 h1.7
  text "Monday, July 13, 2020" at 75.3,-86.325 h1.7
  text "'.Print_Date'" at 103.725,-86.325 h1.7
  text "1" at 133.85,-86.325 h1.7
  text "of" at 136.975,-86.325 h1.7
  text "2" at 139.7,-86.325 h1.7
Mechanical 28:
  lines w0.2: -122.4,-40.25 -120.775,-40.25 ; -122.4,6.425 -120.775,6.425 ; -122.4,53.1 -120.775,53.1 ; -67.75,-88.5 -67.75,-86.9 ; -67.75,99.8 -67.75,101.4 ; -14.725,-88.5 -14.725,-86.9 ; -14.725,99.8 -14.725,101.4 ; 38.3,-88.5 38.3,-86.9 ; 38.3,99.8 38.3,101.4 ; 91.325,-88.5 91.325,-86.9 ; 91.325,99.8 91.325,101.4 ; 144.35,-40.225 145.975,-40.225 ; 144.35,6.45 145.975,6.45 ; 144.35,53.125 145.975,53.125 ; 145.975,-88.5 -122.4,-88.5 -122.4,101.4 145.975,101.4 145.975,-88.475 ; -120.775,-86.9 -120.775,99.8 144.35,99.8 144.35,-86.9 -120.775,-86.9
  text "5" at -94.1,100.325 h0.5
  text "4" at -41.075,100.3 h0.5
  text "3" at 11.95,100.3 h0.5
  text "2" at 64.975,100.3 h0.5
  text "1" at 117.95,100.3 h0.5
  text "D" at 145.35,76.2 h0.5
  text "D" at -121.4,76.175 h0.5
  text "C" at 145.35,29.5 h0.5
  text "C" at -121.4,29.475 h0.5
  text "B" at 145.35,-17.175 h0.5
  text "B" at -121.4,-17.2 h0.5
  text "A" at 145.35,-63.825 h0.5
  text "A" at -121.4,-63.85 h0.5
  text "5" at -94.1,-87.975 h0.5
  text "4" at -41.075,-88 h0.5
  text "3" at 11.95,-88 h0.5
  text "2" at 64.975,-88 h0.5
  text "1" at 117.95,-88 h0.5
Mechanical 29:
  drawing of 28 lines, arcs and shapes, not listed
  text "Board Title" at -51.175,-61.95 h2.5
  text ".BoardTitle" at -52.575,-67.5 h3.5
  text "Page Title" at -51.175,-71.675 h2.5
  text "Approved:" at -35.125,-75.425 h1.7
  text "Designed:" at -18.925,-75.425 h1.7
  text "Bottom Assembly" at -52.575,-75.575 h3.2
  text "RGU" at -36.5,-77.925 h2.2
  text "TAB" at -20.45,-77.925 h2.2
  text "Revision" at -109.075,-78.7 h1.7
  text "Document number" at -51.175,-78.975 h2.35
  text "BOM Doc. No:" at -23.85,-80.175 h1.7
  text "Size" at -18.925,-80.175 h1.7
  text ".BoardRevision" at -109.339,-81.75 h2.7
  text ".BoardName" at -52.575,-81.85 h3.2
  text "<>" at -24.425,-82.025 h2
  text "A4" at -19.5,-82.025 h2
  text "Sheet" at -109.075,-84.375 h1.7
  text "Sheet Modified Date:" at -79.025,-84.375 h1.7
  text "Sheet Created Date:" at -50.6,-84.375 h1.7
  text "Design Created Date:" at -18.925,-84.375 h1.7
  text "2" at -116.125,-86.325 h1.7
  text "of" at -113.4,-86.325 h1.7
  text "2" at -110.275,-86.325 h1.7
  text "'.Print_Date'" at -80.15,-86.325 h1.7
  text "Monday, July 13, 2020" at -51.725,-86.325 h1.7
  text "Monday, July 13, 2020" at -20,-86.325 h1.7
Mechanical 30:
  lines w0.2: -126.75,-94.975 156.75,-94.975 156.75,105.5 -126.75,105.5 -126.75,-94.975

## Text inside footprints (layer, text, board x,y; h text height)
Designator39: Mechanical 31 ":" at -13.15,171.491 h2.3; Mechanical 31 ": 0.10 mm (4 mils)" at 72.825,163.69 h2.3; Mechanical 31 ": 0.10 mm (4 mils)" at 72.8,159.725 h2.3; Mechanical 31 ": 0.50 mm (20 mils)" at 72.85,155.72 h2.3; Mechanical 31 "resist dams (between QFNand BGA pads) is allowed." at -8.7,199.7 h2.3; Mechanical 31 "If needed, removal of thin (less than 0.25mm) solder" at -8.7,204.2 h2.3; Mechanical 31 "-------------------------------------------------------------------------" at -48.7,376.2 h2.3; Mechanical 31 "*** PCB SPECIFICATION FOR BARE BOARD MANUFACTURING ***" at -48.7,380.2 h2.3; Mechanical 31 "<------------------------------------------------------------------------ 1(2)" at -48.7,384.2 h2.3; Mechanical 31 ":" at -12.7,372.2 h2.3; Mechanical 31 ":" at -12.7,368.2 h2.3; Mechanical 31 ":" at -12.7,360.2 h2.3; Mechanical 31 ":" at -12.7,356.2 h2.3; Mechanical 31 ":" at -12.7,348.2 h2.3; Mechanical 31 ":" at -12.7,344.2 h2.3; Mechanical 31 ":" at -12.7,340.2 h2.3; Mechanical 31 ":" at -12.7,336.2 h2.3; Mechanical 31 "Cu TRACK(TRACE)" at -48.823,163.721 h2.3; Mechanical 31 "Page 1" at 35.3,132.2 h2.3; Mechanical 31 "Silicon Labs" at -8.7,372.2 h2.3; Mechanical 31 "Tamas Bodi" at -8.7,348.2 h2.3; Mechanical 31 "12 (4 x 3)" at -8.7,344.2 h2.3; Mechanical 31 "210.2 x 205.4 mm" at -8.7,340.2 h2.3; Mechanical 31 "30.0 x 45.0 mm" at -8.7,336.2 h2.3; Mechanical 31 "1.6 mm +/-10%" at -8.7,332.2 h2.3; Mechanical 31 "4" at -8.7,328.2 h2.3; Mechanical 31 "WHITE, BOTH SIDES (TOP + BOT)" at -8.323,171.721 h2.3; Mechanical 31 "SEE BUILD-UP" at -8.7,232.2 h2.3; Mechanical 31 "LEGEND/SILKSCR." at -48.823,171.721 h2.3; Mechanical 31 "VIA HOLES" at -48.7,195.2 h2.3; Mechanical 31 "RESIST MASK" at -48.7,220.2 h2.3; Mechanical 31 "COPPER PASSIV." at -48.7,228.2 h2.3; Mechanical 31 "COPPER THK." at -48.7,232.2 h2.3; Mechanical 31 ":" at -12.7,232.2 h2.3; Mechanical 31 ":" at -12.7,228.2 h2.3; Mechanical 31 ":" at -12.7,220.2 h2.3; Mechanical 31 ":" at -12.7,195.2 h2.3; Mechanical 31 "GENERAL REQ." at -48.7,288.2 h2.3; Mechanical 31 "QUALITY REQ." at -48.7,296.2 h2.3; Mechanical 31 "MARKINGS" at -48.7,316.2 h2.3; Mechanical 31 "MATERIAL(S)" at -48.7,324.2 h2.3; Mechanical 31 "NO OF LAYERS" at -48.7,328.2 h2.3; Mechanical 31 ":" at -12.7,328.2 h2.3; Mechanical 31 ":" at -12.7,324.2 h2.3; Mechanical 31 ":" at -12.7,316.2 h2.3; Mechanical 31 ":" at -12.7,296.2 h2.3; Mechanical 31 ":" at -12.7,288.2 h2.3; Mechanical 31 ":" at -12.7,332.2 h2.3; Mechanical 31 "PRODUCT OWNER" at -48.7,372.2 h2.3; Mechanical 31 "DOCUMENT/BOARD" at -48.7,368.2 h2.3; Mechanical 31 "DATE" at -48.7,360.2 h2.3; Mechanical 31 "REVISION" at -48.7,356.2 h2.3; Mechanical 31 "-------------------------------------------------------------------------" at -48.7,352.2 h2.3; Mechanical 31 "PREPARED BY" at -48.7,348.2 h2.3; Mechanical 31 "BOARDS pr PANEL" at -48.7,344.2 h2.3; Mechanical 31 "PANEL SIZE" at -48.7,340.2 h2.3; Mechanical 31 "BOARD SIZE" at -48.7,336.2 h2.3; Mechanical 31 "BOARD THICKNESS" at -48.7,332.2 h2.3; Mechanical 31 "NOMINAL VALUES for Width, Spacing and VIA Diameter:" at -48.823,167.721 h2.3; Mechanical 31 "(SPECIFICATION CONTINUED ON NEXT PAGE)" at -48.823,139.721 h2.3; Mechanical 31 "Cu TRACK(TRACE)" at -48.823,159.721 h2.3; Mechanical 31 ":" at -12.823,163.721 h2.3; Mechanical 31 "Minimum conductor width" at -8.823,163.721 h2.3; Mechanical 31 "Minimum conductor spacing" at -8.823,159.721 h2.3; Mechanical 31 ":" at -12.823,159.721 h2.3; Mechanical 31 "MINIMUM VIA" at -48.823,155.721 h2.3; Mechanical 31 ":" at -12.823,155.721 h2.3; Mechanical 31 "Minimum via pad diameter" at -8.823,155.721 h2.3; Mechanical 31 "Minimum finished via hole diameter   : 0.25 mm (9.8 mils)" at -8.823,151.721 h2.3; Mechanical 31 "Min via hole may have more than one pad diameter." at -8.823,147.721 h2.3; Mechanical 31 "for the Top Side, and Overprinted (Tented) Bot Side is OK." at -8.7,183.2 h2.3; Mechanical 31 "material. If Type IV-b is not available as a process, Type IV-a" at -8.7,187.2 h2.3; Mechanical 31 "Plugged and Covered Both Sides, Low CTE non-conductive plugging" at -8.7,191.2 h2.3; Mechanical 31 "PLUGGED/FILLED, IPC-4761 (current revision) Type IV-b" at -8.7,195.2 h2.3; Mechanical 31 "Solder Mask Color: MATTE BLACK" at -8.7,220.2 h2.3; Mechanical 31 "Photo Polymer Wet film" at -8.7,216.2 h2.3; Mechanical 31 "to IPC-SM-840 Class T requirements (current revision)" at -8.7,212.2 h2.3; Mechanical 31 "Thickness minimum 8 um." at -8.7,208.2 h2.3; Mechanical 31 "ENIG to meet IPC-4552 requirements (current revision)" at -8.7,228.2 h2.3; Mechanical 31 "(Electroless Nickel/Immersion Gold)" at -8.7,224.2 h2.3; Mechanical 31 "- Copper must not be added or removed from inside the board" at -8.7,288.2 h2.3; Mechanical 31 "outline(s), without written consent/approval." at -8.7,284.2 h2.3; Mechanical 31 "Use the balancing of the panel that comes with the" at -8.7,280.2 h2.3; Mechanical 31 "Gerber files (without alterations)" at -8.7,276.2 h2.3; Mechanical 31 "If applicable, the following requirements are valid:" at -8.7,272.2 h2.3; Mechanical 31 "- If Build-Up (Stack-Up) is specified, follow Build-Up," at -8.7,268.2 h2.3; Mechanical 31 "otherwise use (board manufacturer) standard Build-Up." at -8.7,264.2 h2.3; Mechanical 31 "- Break-away areas may be used for patterns, holes etc." at -8.7,260.2 h2.3; Mechanical 31 "by manufacturer for QA purposes." at -8.7,256.2 h2.3; Mechanical 31 "- If V-CUT, use angle 30 +/- 5 degrees." at -8.7,252.2 h2.3; Mechanical 31 "V-CUT minimum remaining thickness 0.5 +/- 0.1 mm." at -8.7,248.2 h2.3; Mechanical 31 "Use of V-CUT test pads is allowed." at -8.7,244.2 h2.3; Mechanical 31 "- Inner radius (contour/outline) 1.2 mm, unless stated" at -8.7,240.2 h2.3; Mechanical 31 "otherwise." at -8.7,236.2 h2.3; Mechanical 31 "refered to by IPC-A-600" at -8.7,292.2 h2.3; Mechanical 31 "IPC-A-600 (current revisions) Class 2, and IPC specifications" at -8.7,296.2 h2.3; Mechanical 31 "Logo, Week/Year, UL (ON SECONDARY SIDE (BOT))" at -8.7,316.2 h2.3; Mechanical 31 "(Avoid areas reserved for DataMatrix, Barcodes or Lables)" at -8.7,312.2 h2.3; Mechanical 31 "All PCB manufacturer's markings (Logo, Week/Year, UL)" at -8.7,308.2 h2.3; Mechanical 31 "shall be put in the breakaway areas of the panel frame," at -8.7,304.2 h2.3; Mechanical 31 "to the bottom silkscreen. No marking on the boards is allowed!" at -8.7,300.2 h2.3; Mechanical 31 "Glass Epoxy FR-4, NEMA Class 2, UL 94V-0, Tg min 150 C" at -8.7,324.2 h2.3; Mechanical 31 "Materials in compliance with the RoHS and WEEE directives" at -8.7,320.2 h2.3; Mechanical 31 "Vias opened on one side should be plugged only from the other" at -8.728,179.222 h2.3; Mechanical 31 "side. (CTE: Coefficient of Thermal Expansion)" at -8.635,175.244 h2.3; Mechanical 32 "the surrounding copper. Please follow the gerbers for those as well!" at -48.846,186.613 h2.3; Mechanical 32 "Fiducials could also have different solrder mask size/shape exposing or covering" at -48.856,190.163 h2.3; Mechanical 32 "ground copper ring around the testpoint. This exposed copper ring is intentional." at -48.801,201.469 h2.3; Mechanical 32 "The board may contain a special testpoint on the bottom layer with an exposed" at -48.856,205.633 h2.3; Mechanical 32 "Page 2" at 35.3,132.2 h2.3; Mechanical 32 ":" at -28.7,261.225 h2.3; Mechanical 32 "WARNING" at -48.7,261.225 h2.3; Mechanical 32 "TEST" at -48.7,304.2 h2.3; Mechanical 32 ":" at -12.7,304.2 h2.3; Mechanical 32 ":" at -12.7,376.2 h2.3; Mechanical 32 "BUILD UP" at -48.7,376.2 h2.3; Mechanical 32 "--------------------------------------------------------------------------------" at -48.741,212.267 h2.3; Mechanical 32 "--------------------------------------------------------------------------------" at -48.965,183.28 h2.3; Mechanical 32 "Dimensions for the finished board (after plating)." at -48.575,237.195 h2.3; Mechanical 32 "The drill data may contain slots (in a separate file)." at -48.7,241.225 h2.3; Mechanical 32 "hole drill dimensions!" at -24.7,245.225 h2.3; Mechanical 32 "Under no circumstance must these Gerber flashes be mistaken for the" at -24.7,249.225 h2.3; Mechanical 32 "NON-PLATED holes may have a small center marker in the Gerber files." at -24.7,253.225 h2.3; Mechanical 32 "the drill report file(s) (.DRR)." at -24.7,257.225 h2.3; Mechanical 32 "Drill dimensions must be taken from the Excellon (.DRL) file(s), and" at -24.7,261.225 h2.3; Mechanical 32 "NC DRILL - HOLE INFORMATION:" at -48.7,265.667 h2.3; Mechanical 32 "--------------------------------------------------------------------------------" at -48.7,269.225 h2.3; Mechanical 32 "Avoid use of 2125 Prepreg" at -8.7,284.2 h2.3; Mechanical 32 "(Generate netlist from Gerber and Drill files)" at -8.7,292.2 h2.3; Mechanical 32 "Visual inspection" at -8.7,296.2 h2.3; Mechanical 32 "Optical test, AOI (with automatic scanner)" at -8.7,300.2 h2.3; Mechanical 32 "100% Electrical Test" at -8.7,304.2 h2.3; Mechanical 32 "board thickness" at -12.7,316.2 h2.3; Mechanical 32 "Select Center Prepreg thickness in order to reach specified" at -12.7,320.2 h2.3; Mechanical 32 "**)" at -12.7,324.2 h2.3; Mechanical 32 "as close to 300 um as possible! +/-25um tolerance is allowed." at -12.7,332.2 h2.3; Mechanical 32 "The distance between Top-L1 and Bottom-L2 should be" at -12.7,336.2 h2.3; Mechanical 32 "*)" at -12.7,340.2 h2.3; Mechanical 32 "BOT ====" at -12.7,348.2 h2.3; Mechanical 32 "− − −" at -12.7,352.2 h2.3; Mechanical 32 "L2 =====" at -12.7,356.2 h2.3; Mechanical 32 "/////" at -12.7,360.2 h2.3; Mechanical 32 "<------------------------------------------------------------------------ 2(2)" at -48.7,384.2 h2.3; Mechanical 32 "| |========================= 30-38 um Cu (ca) After plating" at 5.3,348.2 h2.3; Mechanical 32 "| |// PREPREG or CORE ////// 300um *" at 5.3,352.2 h2.3; Mechanical 32 "| |========================= 11-18 um Cu" at 5.3,356.2 h2.3; Mechanical 32 "| |// PREPREG or CORE ////// **" at 5.3,360.2 h2.3; Mechanical 32 "| |========================= 11-18 um Cu" at 5.3,364.2 h2.3; Mechanical 32 "/////" at -12.7,368.2 h2.3; Mechanical 32 "| |========================= 30-38 um Cu (ca) After plating" at 5.3,372.2 h2.3; Mechanical 32 "| |// PREPREG or CORE ////// 300um *" at 5.3,368.2 h2.3; Mechanical 32 "TOP ====" at -12.7,372.2 h2.3; Mechanical 32 "L1 =====" at -12.7,364.2 h2.3; Mechanical 32 "Please follow the gerbers!" at -48.916,197.421 h2.3; Mechanical 32 "Nominal tolerances (if no other tolerancces given)" at -48.575,233.355 h2.3; Mechanical 32 "PTH +/− 0.10 mm for d <= 2.0 mm" at -48.565,229.22 h2.3; Mechanical 32 "PTH +/− 0.15 mm for 2.0 < d <= 5.3 mm" at -48.6,225.795 h2.3; Mechanical 32 "PTH +/− 0.20 mm for d > 5.3 mm" at -48.535,222.49 h2.3; Mechanical 32 "NPTH +/− 0.10 mm for d <= 5.3 mm" at -48.53,219.115 h2.3; Mechanical 32 "NPTH +/− 0.10 mm for d > 5.3 mm" at -48.53,215.72 h2.3
P200: Mechanical 12 "2" at 2.783,30.118 h0.4 r180; Mechanical 12 "1" at 2.884,28.086 h0.4 r180; Mechanical 12 "40" at 26.659,30.067 h0.4 r180; Bottom Overlay "1" at 2,26.8 h1.25; Bottom Overlay "40" at 28.8,30.8 h1.25
P201: Mechanical 12 "2" at 2.783,6.118 h0.4 r180; Mechanical 12 "1" at 2.884,4.086 h0.4 r180; Mechanical 12 "40" at 26.659,6.067 h0.4 r180; Bottom Overlay "1" at 2.2,2.8 h1.25; Bottom Overlay "40" at 28.8,6.8 h1.25